# Altium PCB PCB2.pcbdoc
Units mil, origin at the board's own origin, x right, y up, seen from the top; angles counter-clockwise.
Board outline 5640.81 x 11073.37 mil, 2 copper layers (Top Layer, Bottom Layer); 67 components, 76 nets, 616 pads, 0 vias.
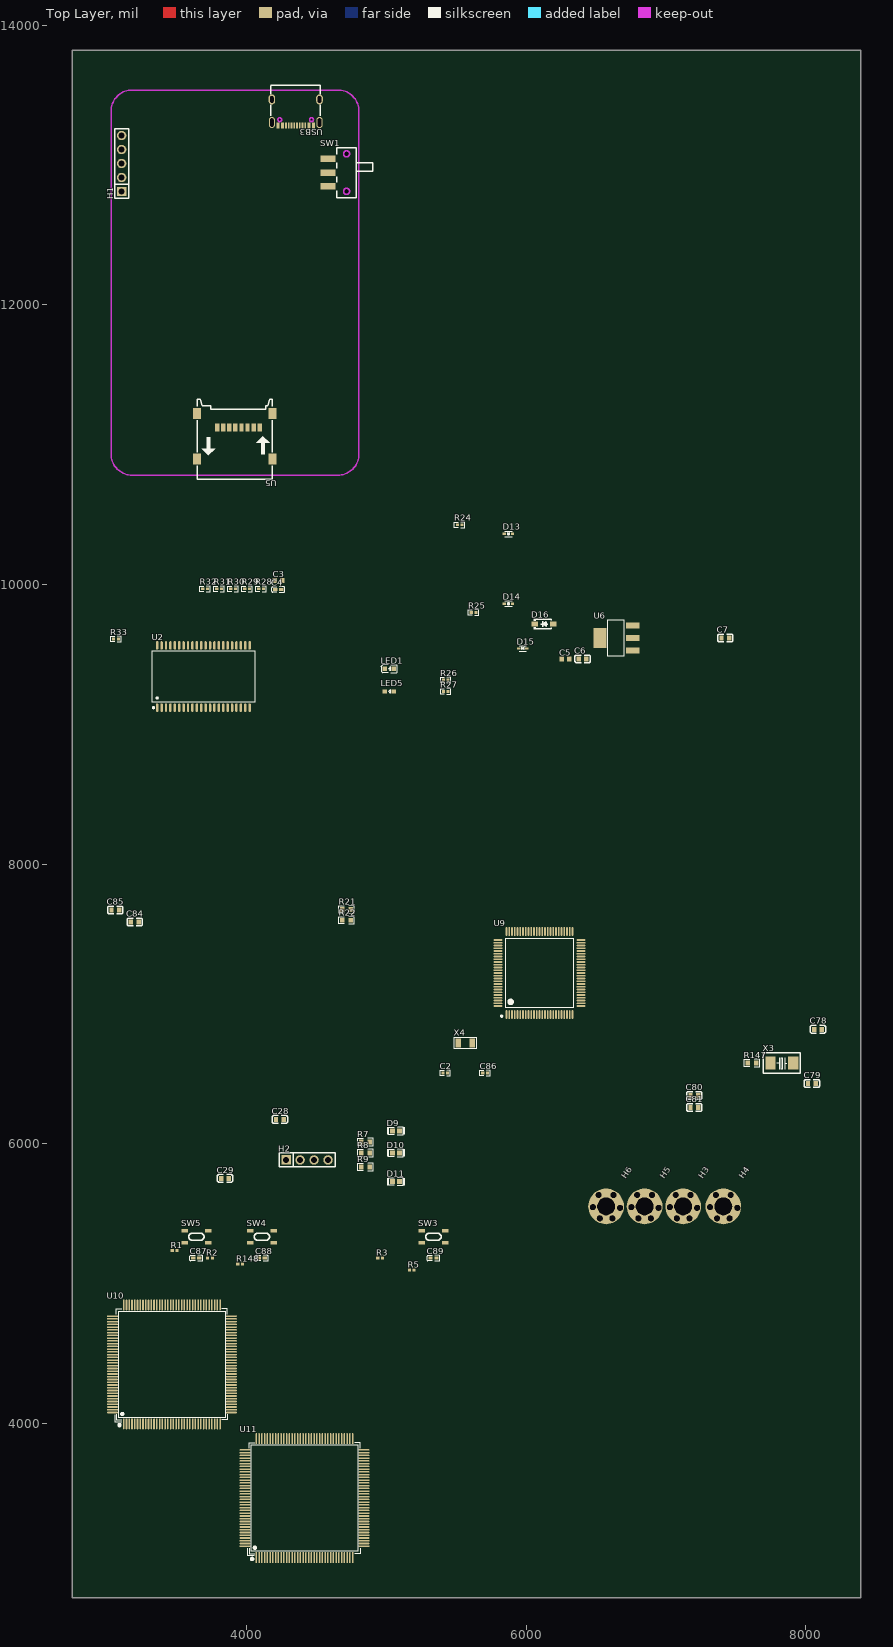
[diagram p0: Top Layer view]
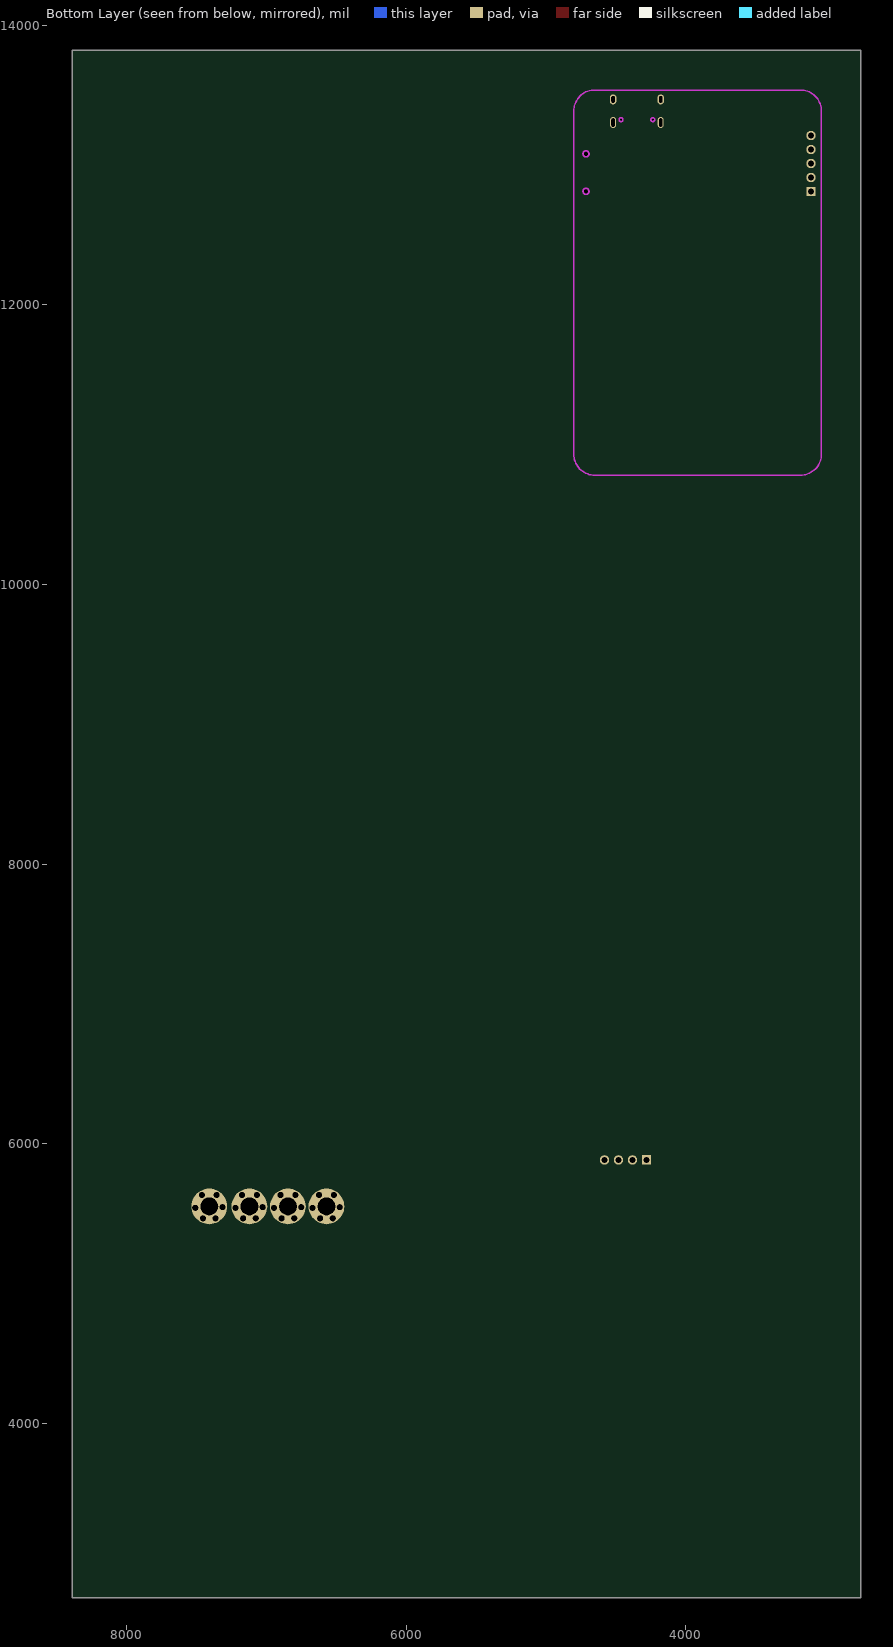
[diagram p1: Bottom Layer view, seen from below]

## Layer stack, top to bottom
Top Layer: signal copper (thickness not stored)
Dielectric: dielectric 12.6, FR-4, Dk 4.8
Bottom Layer: signal copper (thickness not stored)

## Board outline
8390.81,2750 2750,2750 2750,13823.37 8390.81,13823.37

## Design rules (kind name [scope] priority, off if disabled: settings)
BoardOutlineClearance copperThickness1oz [All] p0: genericclearance=10 ignorepadtopadclearanceinfootprint=FALSE except(0: Arc-SplitContinuation Track-SplitContinuation SMDPad-SplitContinuation THPad-SplitContinuation Via-SplitContinuation Fill-SplitContinuation Poly-SplitContinuation Region-SplitContinuation Text-SplitContinuation; 6: Track-CutoutEdge SMDPad-CutoutEdge THPad-CutoutEdge Via-CutoutEdge Region-CutoutEdge; 11.8: Track-OutlineEdge SMDPad-OutlineEdge THPad-OutlineEdge Via-OutlineEdge Fill-OutlineEdge Region-OutlineEdge Poly-OutlineEdge Text-OutlineEdge Fill-CutoutEdge)
BoardOutlineClearance copperThickness2oz [All] p0: genericclearance=10 ignorepadtopadclearanceinfootprint=FALSE except(0: Arc-SplitContinuation Track-SplitContinuation SMDPad-SplitContinuation THPad-SplitContinuation Via-SplitContinuation Fill-SplitContinuation Poly-SplitContinuation Region-SplitContinuation Text-SplitContinuation; 6: Track-CutoutEdge SMDPad-CutoutEdge THPad-CutoutEdge Via-CutoutEdge Region-CutoutEdge; 11.8: Track-OutlineEdge SMDPad-OutlineEdge THPad-OutlineEdge Via-OutlineEdge Fill-OutlineEdge Region-OutlineEdge Poly-OutlineEdge Text-OutlineEdge Fill-CutoutEdge)
Clearance copperThickness1oz [(InNet('GND') OR InNet('3.3V') OR InNet('5V_USB') OR InNet('$1N4593') OR InNet('$1N4201') OR InNet('$1N4774') OR InNet('RST') OR InNet('DIO') OR InNet('CLK') OR InNet('$1N5998') OR InNet('$1N6126') OR InNet('$1N4479') OR InNet('$1N4322') OR InNet('SDIO_D1') OR InNet('SDIO_D0') OR InNet('SDIO_CMD') OR InNet('SDIO_D3') OR InNet('SDIO_D2') OR InNet('SDIO_CLK') OR InNet('$1N4327') OR InNet('$1N4333') OR InNet('A4') OR InNet('A3') OR InNet('A2') OR InNet('A1') OR InNet('A0') OR InNet('CS') OR InNet('A8') OR InNet('A9') OR InNet('A10') OR InNet('A11') OR InNet('$2N10385') OR InNet('A12') OR InNet('A13') OR InNet('A14') OR InNet('A15') OR InNet('WE') OR InNet('A16') OR InNet('A5') OR InNet('A6') OR InNet('A7') OR InNet('OE') OR InNet('UB') OR InNet('LB') OR InNet('IO15') OR InNet('IO14') OR InNet('IO13') OR InNet('IO12') OR InNet('IO11') OR InNet('IO10') OR InNet('IO9') OR InNet('IO8') OR InNet('A18') OR InNet('A17') OR InNet('$1N20111') OR InNet('OSC25_IN') OR InNet('OSC25_OUT') OR InNet('$1N14566') OR InNet('$1N20074') OR InNet('NRST') OR InNet('$1N25234') OR InNet('+3V3') OR InNet('$1N25235') OR InNet('SYS_JTCK-SWCLK') OR InNet('SYS_JTCK-SWDIO') OR InNet('WKUP') OR InNet('BOOT0') OR InNet('USB_OTG_FS_DP') OR InNet('USB_OTG_FS_DM') OR InNet('$1N17610') OR InNet('$1N16448') OR InNet('$1N18803') OR InNet('$1N18799') OR InNet('$1N18795') OR InNet('$1N18791') OR InNet('$1N18807'))] p1: gap=7 ignorepadtopadclearanceinfootprint=FALSE except(4: Track-Track; 6: Track-SMDPad SMDPad-SMDPad Track-THPad SMDPad-THPad THPad-THPad Track-Via SMDPad-Via THPad-Via Via-Via SMDPad-Fill THPad-Fill Via-Fill Fill-Fill Track-Region SMDPad-Region THPad-Region Via-Region Region-Region Track-Poly SMDPad-Poly THPad-Poly Via-Poly Fill-Poly Region-Poly Poly-Poly Track-Text SMDPad-Text THPad-Text Via-Text Fill-Text Region-Text Poly-Text Text-Text; 6.9: Track-Hole SMDPad-Hole THPad-Hole Via-Hole Fill-Hole Region-Hole Poly-Hole Text-Hole Sheet-Hole; 11.8: Track-Fill Fill-Region Track-Sheet SMDPad-Sheet THPad-Sheet Via-Sheet Fill-Sheet Region-Sheet Poly-Sheet Text-Sheet)
Clearance copperThickness2oz [All] p1: gap=7 ignorepadtopadclearanceinfootprint=FALSE except(6: Track-SMDPad SMDPad-SMDPad Track-THPad SMDPad-THPad THPad-THPad Track-Via SMDPad-Via THPad-Via Via-Via SMDPad-Fill THPad-Fill Via-Fill Fill-Fill Track-Region SMDPad-Region THPad-Region Via-Region Region-Region Track-Poly SMDPad-Poly THPad-Poly Via-Poly Fill-Poly Region-Poly Poly-Poly Track-Text SMDPad-Text THPad-Text Via-Text Fill-Text Region-Text Poly-Text Text-Text; 6.9: Track-Hole SMDPad-Hole THPad-Hole Via-Hole Fill-Hole Region-Hole Poly-Hole Text-Hole Sheet-Hole; 8: Track-Track; 11.8: Track-Fill Fill-Region Track-Sheet SMDPad-Sheet THPad-Sheet Via-Sheet Fill-Sheet Region-Sheet Poly-Sheet Text-Sheet)
DiffPairsRouting differentialPair [All] p1: maxuncoupledlength=10 minlimit=6 maxlimit=6 mostfreqgap=6 toplayer_minwidth=5 toplayer_prefwidth=10 toplayer_maxwidth=100 bottomlayer_minwidth=5 bottomlayer_prefwidth=10 bottomlayer_maxwidth=100
PasteMaskExpansion pasteMaskExpansion [All] p1: expansion=0
PlaneConnect innerPlane [All] p1: planeconnectstyle=Relief reliefexpansion=20 reliefentries=4 reliefconductorwidth=10 reliefairgap=10
PolygonConnect copperRegion [All] p1: connectstyle=Relief reliefentries=4 reliefconductorwidth=10 polygonreliefangle="90 Angle" airgapwidth=10
RoutingVias viaSize [All] p1: viastyle="Through Hole" holewidth=12.0078 minholewidth=11.811 maxholewidth=248.0314 width=24.0158 minwidth=19.685 maxwidth=393.7008
SolderMaskExpansion solderMaskExpansion [All] p1: useseparateexpansions=TRUE expansion=2 expansionbottom=2
Width copperThickness1oz [All] p1: maxlimit=100 minlimit=5 preferedwidth=10
Width copperThickness2oz [All] p1: maxlimit=100 minlimit=8 preferedwidth=10

## Components (designator, comment, footprint, x,y, rotation, side; value= is the part's Value field where it differs from the comment)
C2 "CC0402JRNPO9BN100" R0402 5420.01,6505.78 r0 top
C3 "0603X106K100NT" C0603 4227.48,10029.99 r0 top
C4 "CC0402KRX7R7BB104" C0402 4224.85,9964.2 r0 top
C5 "0603X106K100NT" C0603 6279.45,9466.89 r0 top
C6 "CL10A105KB8NNNC" C0603 6402.17,9467.56 r0 top
C7 "CL10A105KB8NNNC" C0603 7423.61,9617.33 r0 top
C28 "CC0603KRX7R9BB104" C0603 4236.91,6173.72 r0 top
C29 "CC0603KRX7R9BB104" C0603 3844.58,5752.04 r0 top
C78 "CL10C200JB8NNNC" C0603 8086.09,6818.25 r0 top
C79 "CL10C200JB8NNNC" C0603 8042.64,6430.5 r0 top
C80 "CL10A225KO8NNNC" C0603 7201.68,6344.91 r0 top
C81 "CL10A225KO8NNNC" C0603 7201.68,6259.31 r0 top
C84 "CC0603KRX7R9BB104" C0603 3198.85,7586.22 r0 top
C85 "CC0603KRX7R9BB104" C0603 3059.72,7671.82 r0 top
C86 "CC0402JRNPO9BN100" R0402 5705.53,6505.78 r0 top
C87 "CC0402KRX7R7BB104" C0402 3639.93,5180.98 r0 top
C88 "CC0402KRX7R7BB104" C0402 4108.49,5180.98 r0 top
C89 "CC0402KRX7R7BB104" C0402 5336.33,5180.98 r0 top
D9 "0603ESDA-05N" D0603-BI 5067.15,6091.08 r0 top
D10 "0603ESDA-05N" D0603-BI 5067.15,5933.69 r0 top
D11 "0603ESDA-05N" D0603-BI 5067.15,5728.72 r0 top
D13 "LESD5D5.0CT1G" SOD-523_L1.2-W0.8-LS1.6-BI 5871.98,10362.77 r0 top
D14 "LESD5D5.0CT1G" SOD-523_L1.2-W0.8-LS1.6-BI 5871.98,9862.77 r0 top
D15 "LESD5D5.0CT1G" SOD-523_L1.2-W0.8-LS1.6-BI 5974.34,9542.44 r0 top
D16 "1N5819HW" SOD-123_L2.7-W1.6-LS3.7-RD-1 6125.91,9717.33 r0 top
H1 "PZ254V-11-05P" HDR-TH_5P-P2.54-V-M 3105,13011.49 r90 top
H2 "PZ254V-11-04P" HDR-TH_4P-P2.54-V-M 4431.73,5883.69 r0 top
H3 "m3_3" "m3 125x300" 7121.68,5551.08 r0 top
H4 "m3_3" "m3 125x300" 7409.04,5551.08 r0 top
H5 "m3_3" "m3 125x300" 6846.09,5551.08 r0 top
H6 "m3_3" "m3 125x300" 6570.5,5551.08 r0 top
LED1 "19-217/R6C-AL1M2VY/3T" LED0603-RD 5019.35,9396.26 r0 top
LED5 "19-213/Y2C-CQ2R2L/3T(CY)" LED0603-RD-YELLOW 5019.35,9234.43 r0 top
R1 "RC0402FR-0710KL" R0402 3483.7,5235.6 r0 top
R2 "RC0402FR-0710KL" R0402 3736.9,5180.98 r0 top
R3 "RC0402FR-0710KL" R0402 4954.19,5180.98 r0 top
R5 "RC0402FR-0710KL" R0402 5180.11,5095.32 r0 top
R7 "0603WAF499JT5E" R0603 4848.69,6012.38 r0 top
R8 "0603WAF499JT5E" R0603 4848.69,5933.69 r0 top
R9 "0603WAF499JT5E" R0603 4848.69,5833.69 r0 top
R21 "0603WAF499JT5E" R0603 4713.95,7675.77 r0 top
R22 "0603WAF499JT5E" R0603 4713.95,7598.07 r0 top
R24 "0402WGF5101TCE" R0402 5523.25,10427.33 r0 top
R25 "0402WGF5101TCE" R0402 5623.28,9798.21 r0 top
R26 "0402WGF4701TCE" R0402 5423.21,9316.26 r0 top
R27 "0402WGF1001TCE" R0402 5423.21,9234.43 r0 top
R28 "0402WGF1002TCE" R0402 4102.62,9969.47 r0 top
R29 "0402WGF1002TCE" R0402 4002.58,9969.47 r0 top
R30 "0402WGF1002TCE" R0402 3902.55,9969.47 r0 top
R31 "0402WGF1002TCE" R0402 3802.51,9969.47 r0 top
R32 "0402WGF1002TCE" R0402 3702.48,9969.47 r0 top
R33 "0402WGF1002TCE" R0402 3065.18,9609.8 r0 top
R147 "0603WAF1004T5E" R0603 7614.21,6577.1 r0 top
R148 "RC0402FR-0710KL" R0402 3952.27,5138.15 r0 top
SW1 "K3-1280S-K1" SW-SMD_K3-1280S-K1 4580,12946.49 r0 top
SW3 "TSA017A2540A07" SW-SMD_4P-L4.2-W3.4-P2.15-LS5.2 5336.33,5334.06 r0 top
SW4 "TSA017A2540A07" SW-SMD_4P-L4.2-W3.4-P2.15-LS5.2 4108.49,5334.06 r0 top
SW5 "TSA017A2540A03" SW-SMD_4P-L4.2-W3.4-P2.15-LS5.2 3639.93,5334.06 r0 top
U2 "IS62WV51216BLL-55TLI" TSOP-44_L18.4-W10.2-P0.80-LS11.8-BL 3690,9341.49 r0 top
U5 "ZX-TF-281.6J" TF-SMD_ZX-TF-281.6J 3915,11061.49 r180 top
U6 "AMS1117-3.3_C6186" SOT-223-3_L6.5-W3.4-P2.30-LS7.0-BR 6644.57,9617.33 r0 top
U9 "STM32F407VET6" LQFP-100_L14.0-W14.0-P0.50-LS16.0-BL 6094.12,7220.64 r0 top
U10 "STM32F407ZET6" LQFP-144_L20.0-W20.0-P0.50-LS22.0-BL 3464.57,4421.27 r0 top
U11 "STM32H723ZET6" LQFP-144_L20.0-W20.0-P0.50-LS22.0-BL 4413.4,3464.57 r0 top
USB3 "TYPE-C 16PIN 2MD(073)" USB-C-SMD_TYPE-C-6PIN-2MD-073 4350,13376.49 r180 top
X3 "X503225MSB2GI" OSC-SMD_L5.0-W3.2 7827.33,6577.1 r0 top
X4 "FC31M2-32.768-NTLLLDT" crystal-smd_l3.2-w1.5-1 5562.77,6720.11 r0 top

## Footprints (in the part's own frame and the unit in brackets; to place one, negate y for a bottom-side part, rotate by r counter-clockwise, add the part's x,y. Pads: shape width x height; smd on the part's side, far side on the other; paste and mask are expansions set on the pad)
C0402 [mm]
  rect 0.79x0.54 smd: 1(-0.545,0) 2(0.545,0)
  silkscreen extent -1.17,-0.5 1.17,0.5
C0603 [mm]
  rect 0.8x0.9 smd: 1(-0.7,0) 2(0.7,0)
crystal-smd_l3.2-w1.5-1 [mil]
  rect 41.3x66.9 smd: 1(-50.2,0) 2(50.2,0)
  silkscreen extent -80,-42 80,42
D0603-BI [mil]
  rect 34.38x35.72 smd: 1(-24.47,0) 2(24.47,0)
  silkscreen extent -60,-27 60,27
HDR-TH_4P-P2.54-V-M [mm]
  rect 1.7x1.7 hole 1.1: 1(-3.81,0)
  round 1.7 hole 1.1: 2(-1.27,0) 3(1.27,0) 4(3.81,0)
  silkscreen extent -5.08,-1.27 5.08,1.27
HDR-TH_5P-P2.54-V-M [mm]
  rect 1.7x1.7 hole 1.1: 1(-5.08,0)
  round 1.7 hole 1.1: 2(-2.54,0) 3(0,0) 4(2.54,0) 5(5.08,0)
  silkscreen extent -6.35,-1.27 6.35,1.27
LED0603-RD [mm]
  rect 0.8x0.8 smd: 1(-0.799,0) 2(0.799,0)
  silkscreen extent -1.49,-0.75 1.39,0.76
LED0603-RD-YELLOW [mm]
  rect 0.8x0.8 smd: 1(-0.799,-0.003) 2(0.799,0.003)
  silkscreen extent -0.12,-0.32 0.22,0.36
LQFP-100_L14.0-W14.0-P0.50-LS16.0-BL [mm]
  oval 0.3x1.6 smd: 1(-6,-7.55) 2(-5.5,-7.55) 3(-5,-7.55) 4(-4.5,-7.55) 5(-4,-7.55) 6(-3.5,-7.55) 7(-3,-7.55) 8(-2.5,-7.55) 9(-2,-7.55) 10(-1.5,-7.55) 11(-1,-7.55) 12(-0.5,-7.55) 13(0,-7.55) 14(0.5,-7.55) 15(1,-7.55) 16(1.5,-7.55) 17(2,-7.55) 18(2.5,-7.55) 19(3,-7.55) 20(3.5,-7.55) 21(4,-7.55) 22(4.5,-7.55) 23(5,-7.55) 24(5.5,-7.55) 25(6,-7.55) 51(6,7.55) 52(5.5,7.55) 53(5,7.55) 54(4.5,7.55) 55(4,7.55) 56(3.5,7.55) 57(3,7.55) 58(2.5,7.55) 59(2,7.55) 60(1.5,7.55) 61(1,7.55) 62(0.5,7.55) 63(0,7.55) 64(-0.5,7.55) 65(-1,7.55) 66(-1.5,7.55) 67(-2,7.55) 68(-2.5,7.55) 69(-3,7.55) 70(-3.5,7.55) 71(-4,7.55) 72(-4.5,7.55) 73(-5,7.55) 74(-5.5,7.55) 75(-6,7.55)
  oval 1.6x0.3 smd: 26(7.55,-6) 27(7.55,-5.5) 28(7.55,-5) 29(7.55,-4.5) 30(7.55,-4) 31(7.55,-3.5) 32(7.55,-3) 33(7.55,-2.5) 34(7.55,-2) 35(7.55,-1.5) 36(7.55,-1) 37(7.55,-0.5) 38(7.55,0) 39(7.55,0.5) 40(7.55,1) 41(7.55,1.5) 42(7.55,2) 43(7.55,2.5) 44(7.55,3) 45(7.55,3.5) 46(7.55,4) 47(7.55,4.5) 48(7.55,5) 49(7.55,5.5) 50(7.55,6) 76(-7.55,6) 77(-7.55,5.5) 78(-7.55,5) 79(-7.55,4.5) 80(-7.55,4) 81(-7.55,3.5) 82(-7.55,3) 83(-7.55,2.5) 84(-7.55,2) 85(-7.55,1.5) 86(-7.55,1) 87(-7.55,0.5) 88(-7.55,0) 89(-7.55,-0.5) 90(-7.55,-1) 91(-7.55,-1.5) 92(-7.55,-2) 93(-7.55,-2.5) 94(-7.55,-3) 95(-7.55,-3.5) 96(-7.55,-4) 97(-7.55,-4.5) 98(-7.55,-5) 99(-7.55,-5.5) 100(-7.55,-6)
  silkscreen extent -7.03,-8 6.25,6.25
LQFP-144_L20.0-W20.0-P0.50-LS22.0-BL [mm]
  oval 0.28x2 smd: 1(-8.75,-10.8) 2(-8.25,-10.8) 3(-7.75,-10.8) 4(-7.25,-10.8) 5(-6.75,-10.8) 6(-6.25,-10.8) 7(-5.75,-10.8) 8(-5.25,-10.8) 9(-4.75,-10.8) 10(-4.25,-10.8) 11(-3.75,-10.8) 12(-3.25,-10.8) 13(-2.75,-10.8) 14(-2.25,-10.8) 15(-1.75,-10.8) 16(-1.25,-10.8) 17(-0.75,-10.8) 18(-0.25,-10.8) 19(0.25,-10.8) 20(0.75,-10.8) 21(1.25,-10.8) 22(1.75,-10.8) 23(2.25,-10.8) 24(2.75,-10.8) 25(3.25,-10.8) 26(3.75,-10.8) 27(4.25,-10.8) 28(4.75,-10.8) 29(5.25,-10.8) 30(5.75,-10.8) 31(6.25,-10.8) 32(6.75,-10.8) 33(7.25,-10.8) 34(7.75,-10.8) 35(8.25,-10.8) 36(8.75,-10.8) 73(8.75,10.8) 74(8.25,10.8) 75(7.75,10.8) 76(7.25,10.8) 77(6.75,10.8) 78(6.25,10.8) 79(5.75,10.8) 80(5.25,10.8) 81(4.75,10.8) 82(4.25,10.8) 83(3.75,10.8) 84(3.25,10.8) 85(2.75,10.8) 86(2.25,10.8) 87(1.75,10.8) 88(1.25,10.8) 89(0.75,10.8) 90(0.25,10.8) 91(-0.25,10.8) 92(-0.75,10.8) 93(-1.25,10.8) 94(-1.75,10.8) 95(-2.25,10.8) 96(-2.75,10.8) 97(-3.25,10.8) 98(-3.75,10.8) 99(-4.25,10.8) 100(-4.75,10.8) 101(-5.25,10.8) 102(-5.75,10.8) 103(-6.25,10.8) 104(-6.75,10.8) 105(-7.25,10.8) 106(-7.75,10.8) 107(-8.25,10.8) 108(-8.75,10.8)
  oval 2x0.28 smd: 37(10.8,-8.75) 38(10.8,-8.25) 39(10.8,-7.75) 40(10.8,-7.25) 41(10.8,-6.75) 42(10.8,-6.25) 43(10.8,-5.75) 44(10.8,-5.25) 45(10.8,-4.75) 46(10.8,-4.25) 47(10.8,-3.75) 48(10.8,-3.25) 49(10.8,-2.75) 50(10.8,-2.25) 51(10.8,-1.75) 52(10.8,-1.25) 53(10.8,-0.75) 54(10.8,-0.25) 55(10.8,0.25) 56(10.8,0.75) 57(10.8,1.25) 58(10.8,1.75) 59(10.8,2.25) 60(10.8,2.75) 61(10.8,3.25) 62(10.8,3.75) 63(10.8,4.25) 64(10.8,4.75) 65(10.8,5.25) 66(10.8,5.75) 67(10.8,6.25) 68(10.8,6.75) 69(10.8,7.25) 70(10.8,7.75) 71(10.8,8.25) 72(10.8,8.75) 109(-10.8,8.75) 110(-10.8,8.25) 111(-10.8,7.75) 112(-10.8,7.25) 113(-10.8,6.75) 114(-10.8,6.25) 115(-10.8,5.75) 116(-10.8,5.25) 117(-10.8,4.75) 118(-10.8,4.25) 119(-10.8,3.75) 120(-10.8,3.25) 121(-10.8,2.75) 122(-10.8,2.25) 123(-10.8,1.75) 124(-10.8,1.25) 125(-10.8,0.75) 126(-10.8,0.25) 127(-10.8,-0.25) 128(-10.8,-0.75) 129(-10.8,-1.25) 130(-10.8,-1.75) 131(-10.8,-2.25) 132(-10.8,-2.75) 133(-10.8,-3.25) 134(-10.8,-3.75) 135(-10.8,-4.25) 136(-10.8,-4.75) 137(-10.8,-5.25) 138(-10.8,-5.75) 139(-10.8,-6.25) 140(-10.8,-6.75) 141(-10.8,-7.25) 142(-10.8,-7.75) 143(-10.8,-8.25) 144(-10.8,-8.75)
  silkscreen extent -10.41,-11.25 10.08,10.08
"m3 125x300" [mil]
  round 40 hole 40 slot 40.2 at 0 deg: 1(-95,-5) 1(100,-10)
  round 40 hole 40 slot 40.2 at 120 deg: 1(-53,81.8) 1(45,-85)
  round 40 hole 40 slot 40.2 at 60 deg: 1(-45,-85) 1(53,81.8)
  round 255.91 hole 125 slot 125.2 at 0 deg: 1(0,0)
OSC-SMD_L5.0-W3.2 [mm]
  rect 1.9x2.4 smd: 1(-2.05,0) 2(2.05,0)
  silkscreen extent -3.32,-1.85 3.33,1.85
R0402 [mm]
  rect 0.566x0.54 smd: 1(-0.433,0) 2(0.433,0)
  silkscreen extent -0.94,-0.5 0.94,0.5
R0603 [mil]
  rect 31.75x34.02 smd: 1(-29.66,0) 2(29.66,0)
  silkscreen extent -55,-26 55,26
SOD-123_L2.7-W1.6-LS3.7-RD-1 [mm]
  rect 1.2x0.95 smd: 1(-1.7,0) 2(1.7,0)
  silkscreen extent -1.81,-0.98 1.35,0.98
SOD-523_L1.2-W0.8-LS1.6-BI [mm]
  rect 0.6x0.4 smd: 1(-0.75,0) 2(0.75,0)
  silkscreen extent -0.65,-0.5 0.65,0.5
SOT-223-3_L6.5-W3.4-P2.30-LS7.0-BR [mm]
  rect 2.5x1.1 smd: 1(2.97,-2.3) 2(2.97,0) 3(2.97,2.3)
  rect 2.34x3.6 smd: 4(-2.97,0)
  silkscreen extent -1.57,-3.33 1.37,3.33
SW-SMD_4P-L4.2-W3.4-P2.15-LS5.2 [mm]
  rect 1.2x0.65 smd: 1(-2.15,1.075) 2(2.15,1.075) 3(-2.15,-1.075) 4(2.15,-1.075)
  silkscreen extent -1.4,-0.63 1.39,0.64
SW-SMD_K3-1280S-K1 [mm]
  rect 2.7x1.2 smd: 1(0,2.5) 2(0,0) 3(0,-2.5)
  Board Outline Layer circle w0.005: c3.406,3.4 r0.55
  Board Outline Layer circle w0.005: c3.406,-3.4 r0.55
  Board Outline Layer circle w0.254: c3.406,3.4 r0.55
  Board Outline Layer circle w0.254: c3.406,-3.4 r0.55
  Multi-Layer board cut-out: 3.956,3.4 3.88,3.672 3.679,3.87 3.406,3.943 3.133,3.87 2.932,3.672 2.856,3.4 2.856,3.4 2.932,3.128 3.133,2.93 3.406,2.858 3.679,2.93 3.88,3.128 3.956,3.4
  Multi-Layer board cut-out: 3.956,-3.4 3.88,-3.128 3.679,-2.93 3.406,-2.858 3.133,-2.93 2.932,-3.128 2.856,-3.4 2.856,-3.4 2.932,-3.672 3.133,-3.87 3.406,-3.943 3.679,-3.87 3.88,-3.672 3.956,-3.4
  silkscreen extent 1.63,-4.55 8.15,4.55
TF-SMD_ZX-TF-281.6J [mm]
  rect 0.8x1.5 smd: 1(3.2,-1.55) 2(2.1,-1.55) 3(1,-1.55) 4(-0.1,-1.55) 5(-1.2,-1.55) 6(-2.3,-1.55) 7(-3.4,-1.55) 8(-4.5,-1.55)
  rect 1.45x2 smd: 9(-6.875,-4.15) 10(6.875,-4.15) 11(6.875,4.15) 12(-6.875,4.15)
  silkscreen extent -6.8,-6.7 6.8,7.8
TSOP-44_L18.4-W10.2-P0.80-LS11.8-BL [mm]
  oval 0.448x1.551 smd: 1(-8.4,-5.656) 2(-7.6,-5.656) 3(-6.8,-5.656) 4(-6,-5.656) 5(-5.2,-5.656) 6(-4.4,-5.656) 7(-3.6,-5.656) 8(-2.8,-5.656) 9(-2,-5.656) 10(-1.2,-5.656) 11(-0.4,-5.656) 12(0.4,-5.656) 13(1.2,-5.656) 14(2,-5.656) 15(2.8,-5.656) 16(3.6,-5.656) 17(4.4,-5.656) 18(5.2,-5.656) 19(6,-5.656) 20(6.8,-5.656) 21(7.6,-5.656) 22(8.4,-5.656) 23(8.4,5.656) 24(7.6,5.656) 25(6.8,5.656) 26(6,5.656) 27(5.2,5.656) 28(4.4,5.656) 29(3.6,5.656) 30(2.8,5.656) 31(2,5.656) 32(1.2,5.656) 33(0.4,5.656) 34(-0.4,5.656) 35(-1.2,5.656) 36(-2,5.656) 37(-2.8,5.656) 38(-3.6,5.656) 39(-4.4,5.656) 40(-5.2,5.656) 41(-6,5.656) 42(-6.8,5.656) 43(-7.6,5.656) 44(-8.4,5.656)
  silkscreen extent -9.28,-5.81 9.28,4.65
USB-C-SMD_TYPE-C-6PIN-2MD-073 [mm]
  rect 0.55x1.1 smd: 1(-3.2,2.375) 2(-2.4,2.375) 11(2.4,2.375) 12(3.2,2.375)
  rect 0.3x1.1 smd: 3(-1.75,2.375) 4(-1.25,2.375) 5(-0.75,2.375) 6(-0.25,2.375) 7(0.25,2.375) 8(0.75,2.375) 9(1.25,2.375) 10(1.75,2.375)
  oval 1.2x1.8 hole 0.6 slot 1.2 at 90 deg: 13(-4.325,-2.375) 14(4.325,-2.375)
  oval 1.1x2 hole 0.6 slot 1.5 at 90 deg: 13(-4.325,1.825) 14(4.325,1.825)
  Board Outline Layer circle w0.005: c-2.89,1.305 r0.35
  Board Outline Layer circle w0.005: c2.89,1.305 r0.35
  Board Outline Layer circle w0.254: c-2.89,1.305 r0.35
  Board Outline Layer circle w0.254: c2.89,1.305 r0.35
  Multi-Layer board cut-out: -3.24,1.305 -3.205,1.153 -3.108,1.031 -2.968,0.964 -2.812,0.964 -2.672,1.031 -2.574,1.153 -2.54,1.305 -2.54,1.305 -2.587,1.48 -2.715,1.608 -2.89,1.655 -3.065,1.608 -3.193,1.48 -3.24,1.305
  Multi-Layer board cut-out: 2.54,1.305 2.575,1.153 2.672,1.031 2.812,0.964 2.968,0.964 3.108,1.031 3.206,1.153 3.24,1.305 3.24,1.305 3.193,1.48 3.065,1.608 2.89,1.655 2.715,1.608 2.587,1.48 2.54,1.305
  silkscreen extent -4.5,-4.97 4.57,0.6

## Nets (pads, with @x,y where several pads share a name; then routed paths per layer and width w, separated by ;. In a path a pad name is that pad's centre, name@x,y a point inside that pad or via, vN(x,y) a via of type N, cw(c..) or ccw(c..) an arc to the next point about the centre after c; other vN are vias at no path point)
3.3V: C3.2 C4.2 C28.1 C29.2 C84.1 C85.2 R27.2 R28.2 R29.2 R30.2 R31.2 R32.2 SW1.2 U2.11 U2.33 U5.4 U9.6 U9.11 U9.19 U9.21 U9.22 U9.28 U9.50 U9.75 U9.100
5V_USB: C5.2 C6.2 D16.1 R26.2 U6.3
$1N4201: D15.2 D16.2 USB3.2 USB3.11
$1N4322: R25.1 USB3.4
$1N4327: D13.2 R21.2 USB3.6 USB3.8
$1N4333: D14.2 R22.2 USB3.5 USB3.7
$1N4479: R24.1 USB3.10
$1N4593: C7.1 SW1.1 U6.2 U6.4
$1N4774: H1.1 SW1.3
$1N5998: LED1.2 R26.1
$1N6126: LED5.2 R27.1
$1N14566: C80.1 C81.1 U9.49 U9.73
$1N16448: U9.97
$1N17610: U9.98
$1N18791: U9.66
$1N18795: U9.78
$1N18799: U9.79
$1N18803: U9.80
$1N18807: U9.7
$1N20074: C86.2 U9.9 X4.2
$1N20111: C2.2 U9.8 X4.1
$1N25234: C88.2 R2.2 R148.1 SW4.3 SW4.4
$1N25235: C89.2 R3.2 R5.1 SW3.3 SW3.4
$2N10385: C85.1 U2.12
+3V3: C88.1 C89.1 R1.1 SW3.1 SW3.2 SW4.1 SW4.2
A0: U2.5 U9.5
A1: U2.4 U9.4
A2: U2.3 U9.3 U9.83
A3: U2.2 U9.2 U9.84
A4: U2.1 U9.1 U9.85
A5: U2.44 U9.86
A6: U2.43 U9.87
A7: U2.42 U9.88
A8: U2.7 U2.27 U9.38
A9: U2.8 U2.26 U9.39
A10: U2.9 U2.25 U9.40
A11: U2.10 U2.24 U9.41
A12: U2.13 U2.22
A13: U2.14 U2.21 U9.42
A14: U2.15 U2.20 U9.43 U9.60
A15: U2.16 U2.19 U9.44 U9.59
A16: U2.18 U9.58
A17: U2.23
A18: U2.28
BOOT0: R3.1 U9.94
CLK: H1.4 H2.3 R8.1
CS: U2.6
DIO: H1.3 H2.2 R9.1
GND: C2.1 C3.1 C4.1 C5.1 C6.1 C7.2 C28.2 C29.1 C78.1 C79.1 C80.2 C81.2 C84.2 C86.1 C87.1 D9.2 D10.2 D11.2 D13.1 D14.1 D15.1 H1.5 H2.1 LED1.1 LED5.1 R5.2 R24.2 R25.2 R33.2 R148.2 SW5.1 SW5.2 U2.34 U5.6 U5.9 U5.10 U5.11 U5.12 U6.1 U9.10 U9.20 U9.27 U9.74 U9.99 USB3.1 USB3.12 USB3.13 USB3.14
IO8: U2.29 U9.82
IO9: U2.30 U9.81
IO10: U2.31 U9.46
IO11: U2.32 U9.45 U9.62
IO12: U2.35 U9.61
IO13: U2.36 U9.57
IO14: U2.37 U9.56
IO15: U2.38 U9.55
LB: U2.39
NRST: C87.2 D9.1 R1.2 R7.2 SW5.3 SW5.4 U9.14
OE: U2.41
OSC25_IN: C78.2 R147.2 U9.12 X3.2
OSC25_OUT: C79.2 R147.1 U9.13 X3.1
RST: H1.2 H2.4 R7.1
SDIO_CLK: R33.1 U5.5
SDIO_CMD: R30.1 U5.3
SDIO_D0: R29.1 U5.7
SDIO_D1: R28.1 U5.8
SDIO_D2: R32.1 U5.1
SDIO_D3: R31.1 U5.2
SYS_JTCK-SWCLK: D10.1 R8.2 U9.77
SYS_JTCK-SWDIO: D11.1 R9.2 U9.76
UB: U2.40
USB_OTG_FS_DM: R22.1 U9.71
USB_OTG_FS_DP: R21.1 U9.72
WE: U2.17
WKUP: R2.1 U9.23
pads on no net: H3.1 H4.1 H5.1 H6.1 U9.15 U9.16 U9.17 U9.18 U9.24 U9.25 U9.26 U9.29 U9.30 U9.31 U9.32 U9.33 U9.34 U9.35 U9.36 U9.37 U9.47 U9.48 U9.51 U9.52 U9.53 U9.54 U9.63 U9.64 U9.65 U9.67 U9.68 U9.69 U9.70 U9.89 U9.90 U9.91 U9.92 U9.93 U9.95 U9.96 U10.1 U10.2 U10.3 U10.4 U10.5 U10.6 U10.7 U10.8 U10.9 U10.10 U10.11 U10.12 U10.13 U10.14 U10.15 U10.16 U10.17 U10.18 U10.19 U10.20 U10.21 U10.22 U10.23 U10.24 U10.25 U10.26 U10.27 U10.28 U10.29 U10.30 U10.31 U10.32 U10.33 U10.34 U10.35 U10.36 U10.37 U10.38 U10.39 U10.40 U10.41 U10.42 U10.43 U10.44 U10.45 U10.46 U10.47 U10.48 U10.49 U10.50 U10.51 U10.52 U10.53 U10.54 U10.55 U10.56 U10.57 U10.58 U10.59 U10.60 U10.61 U10.62 U10.63 U10.64 U10.65 U10.66 U10.67 U10.68 U10.69 U10.70 U10.71 U10.72 U10.73 U10.74 U10.75 U10.76 U10.77 U10.78 U10.79 U10.80 U10.81 U10.82 U10.83 U10.84 U10.85 U10.86 U10.87 U10.88 U10.89 U10.90 U10.91 U10.92 U10.93 U10.94 U10.95 U10.96 U10.97 U10.98 U10.99 U10.100 U10.101 U10.102 U10.103 U10.104 U10.105 U10.106 U10.107 U10.108 U10.109 U10.110 U10.111 U10.112 U10.113 U10.114 U10.115 U10.116 U10.117 U10.118 U10.119 U10.120 U10.121 U10.122 U10.123 U10.124 U10.125 U10.126 U10.127 U10.128 U10.129 U10.130 U10.131 U10.132 U10.133 U10.134 U10.135 U10.136 U10.137 U10.138 U10.139 U10.140 U10.141 U10.142 U10.143 U10.144 U11.1 U11.2 U11.3 U11.4 U11.5 U11.6 U11.7 U11.8 U11.9 U11.10 U11.11 U11.12 U11.13 U11.14 U11.15 U11.16 U11.17 U11.18 U11.19 U11.20 U11.21 U11.22 U11.23 U11.24 U11.25 U11.26 U11.27 U11.28 U11.29 U11.30 U11.31 U11.32 U11.33 U11.34 U11.35 U11.36 U11.37 U11.38 U11.39 U11.40 U11.41 U11.42 U11.43 U11.44 U11.45 U11.46 U11.47 U11.48 U11.49 U11.50 U11.51 U11.52 U11.53 U11.54 U11.55 U11.56 U11.57 U11.58 U11.59 U11.60 U11.61 U11.62 U11.63 U11.64 U11.65 U11.66 U11.67 U11.68 U11.69 U11.70 U11.71 U11.72 U11.73 U11.74 U11.75 U11.76 U11.77 U11.78 U11.79 U11.80 U11.81 U11.82 U11.83 U11.84 U11.85 U11.86 U11.87 U11.88 U11.89 U11.90 U11.91 U11.92 U11.93 U11.94 U11.95 U11.96 U11.97 U11.98 U11.99 U11.100 U11.101 U11.102 U11.103 U11.104 U11.105 U11.106 U11.107 U11.108 U11.109 U11.110 U11.111 U11.112 U11.113 U11.114 U11.115 U11.116 U11.117 U11.118 U11.119 U11.120 U11.121 U11.122 U11.123 U11.124 U11.125 U11.126 U11.127 U11.128 U11.129 U11.130 U11.131 U11.132 U11.133 U11.134 U11.135 U11.136 U11.137 U11.138 U11.139 U11.140 U11.141 U11.142 U11.143 U11.144 USB3.3 USB3.9

## Keep-outs
Board Outline Layer:
  lines w10: 3030,10931.49 3030,13387.1 cw(c3180,13387.1) 3180,13537.1 4651.65,13537.1 cw(c4651.65,13387.1) 4801.65,13387.1 4801.65,10931.49 cw(c4651.65,10931.49) 4651.65,10781.49 3180,10781.49 cw(c3180,10931.49) 3030,10931.49